# Altium PCB ffultra_pcb.PcbDoc (part 2 of 3)
Units mm, origin at the board's own origin, x right, y up, seen from the top; angles counter-clockwise.
Board outline 28 x 55 mm, 6 copper layers (Top, GND-T, Inner, Power, GND-B, Bottom), stack 1.538 mm thick; 121 components, 88 nets, 471 pads, 349 vias.
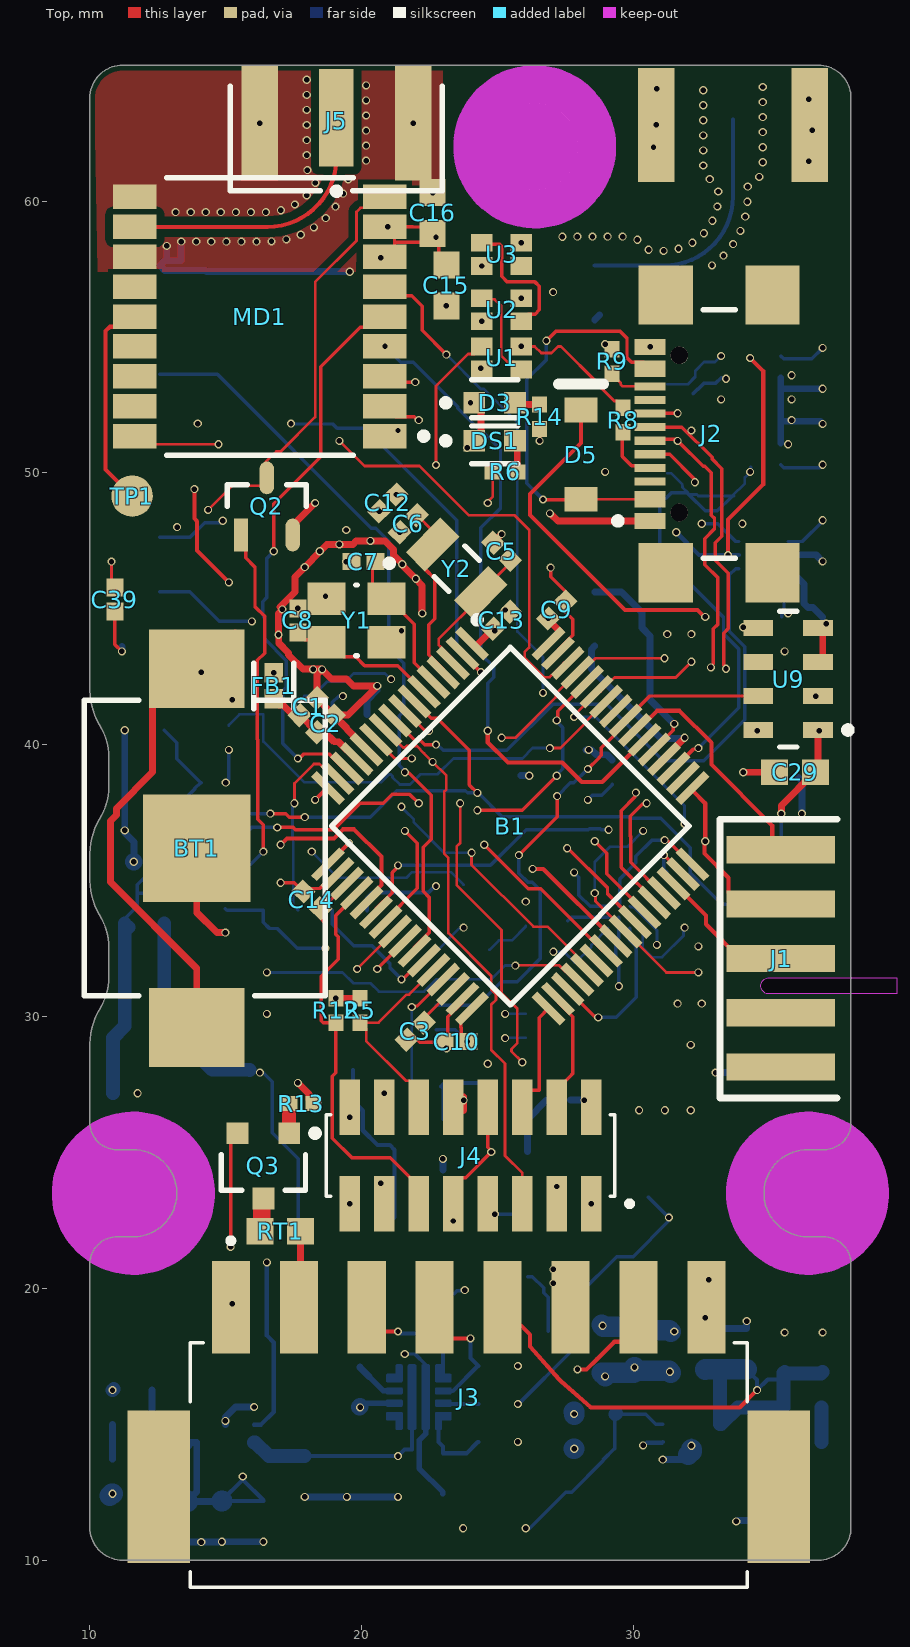
[diagram p0: Top view]

## Part data (continued)
U1 U2 U3: library part CMP-007-00038-2, "1615 RGB LEDs(Built-in IC) ROHS", JLCPCB Part Number=C5349954
U4: library part CMP-00025-00003-3, "LoRa-CC68 targeting 868MHz and with a TXCO"
U5: library part CMP-040-000000-2, "FLASH - NOR Memory IC 128Mb (16M x 8) SPI - Quad I/O, QPI, DTR 133 MHz 8-SOIC", Capacity=128Mb, JLCPCB Part Number=C97521, Package="SOIC-8 Winbond", Design Item ID=W25Q128JVSIQ, LCSC Part #=C97521, MF="Winbond Electronics", MP=W25Q128JVSIQ, Pin Count=8, Price=None
U6: library part CMP-157-000000-2, "No Description Available", JLCPCB Part Number=C5368700, Mfr_Name="Bosch Sensortec", Design Item ID=BMI323, RefDes=RefDes, Source=BMI323.SchLib, Type=Type
U7: library part CMP-010-00036-2, "X,Y,Z LGA-14(3x5) Accelerometer ROHS", Case/Package=VFLGA, JLCPCB Part Number=C481898, Max Operating Temperature=85°C, Max Supply Voltage=3.6V, Min Operating Temperature=-40°C, Min Supply Voltage=2V, Nominal Supply Voltage=2.5V, Pins=14, RoHS Compliant=Yes
U8: library part CMP-010-00035-2, "BMM350 Series 1.98 V I2C/I3C Interface 16 Bit 3 Axis Magnetometer - WLCSP-9", JLCPCB Part Number=C7496950
U9: library part CMP-010-00034-2, "Absolute, 4.35Psi Min, 15.95Psi Max, 0-3V, Rectangular, Surface Mount", JLCPCB Part Number=C97627, Max Operating Temperature=85°C, Max Supply Voltage=3.6V, Min Operating Temperature=-40°C, Min Supply Voltage=1.8V, Mounting Technology="Surface Mount", RoHS Compliant=Yes, Sensor Type="PRESSURE SENSOR,PEIZORESISTIVE"
U10: library part CMP-019-00060-6, "2.7-V to 16-V, 10-A, 6-mΩ load switch with fast overvoltage protection and current monitoring 10-VQFN-HR -40 to 125", JLCPCB Part Number=C17294173
U11_CH1 U11_CH2: library part CMP-019-00059-2, "Buffer/Inverter Based Peripheral Driver, 1 Driver, PDSO6", Case/Package=VSON, JLCPCB Part Number=C527679, Max Operating Temperature=105°C, Max Supply Voltage=18V, Min Operating Temperature=-40°C, Min Supply Voltage=2.7V, Height - Seated (Max)=0.8mm, JESD-30 Code=S-PDSO-N6, Pins=6, RoHS Compliant=Yes
U12: library part CMP-019-00064-1, "Fixed Positive LDO Regulator, 1.8V, 0.3V Dropout, PMOS, PDSO5", Case/Package=LSSOP, Dropout Voltage1-Max=300mV, Input Voltage Absolute-Max=10V, JLCPCB Part #=C7099, Min Input Voltage=2.7V, Operating Temperature, TJ-Max=125°C, Operating Temperature, TJ-Min=-40°C, Output Current1-Max=150mA, Output Voltage1-Max=1.867V, Output Voltage1-Min=1.733V, Output Voltage1-Nom=1.8V, Package Body Material=Plastic, Package Equivalence Code=TSOP5/6,.11,37, Package Shape=Rectangular, Package Style="SMALL OUTLINE, LOW PROFILE, SHRINK PITCHMeter", Peak Reflow Temperature (Cel)=260°C, Voltage Tolerance-Max=3.7%, Adjustability=FIXED, Channels=1, Height - Seated (Max)=1.45mm, JESD-30 Code=R-PDSO-G5, JESD-609 Code=e4, Length=2.9mm, Line Regulation-Max=0.013%, Max Supply Voltage=10V, Moisture Sensitivity Level=1, Number of Outputs=1, Packaging="Tape and Reel", Pins=5, Qualification Status="Not Qualified", Reach SVHC Compliant=Yes, Regulator Type="FIXED POSITIVE SINGLE OUTPUT LDO REGULATOR", RoHS Compliant=Yes, Surface Mount=Yes, Technology=PMOS, Terminal Finish=Nickel, Terminal Form="Gull Wing", Terminal Pitch=0.95mm, Terminal Position=DUAL, Width=1.6mm
Y1: library part CMP-003-00030-1, "Crystal 16MHz ±20ppm (Tol) ±30ppm (Stability) 8pF FUND 80Ohm Automotive 4-Pin SMD", JLCPCB Part Number=C156247
Y2: library part CMP-003-00031-1, "Crystal 32.7680KHZ 7PF SMD", JLCPCB Part Number=C5136773

## Free pads (board coordinates)
  round 3.2 hole 3.2 unplated: 4(26.364,62)

## Via types
v1: diameter 0.3, hole 0.2, Top to Bottom, tented both sides, 349 vias

## Nets (pads, with @x,y where several pads share a name; then routed paths per layer and width w, separated by ;. In a path a pad name is that pad's centre, name@x,y a point inside that pad or via, vN(x,y) a via of type N, cw(c..) or ccw(c..) an arc to the next point about the centre after c; other vN are vias at no path point)
1V8: C24.2 U8.C1 U12.5 | length 9.2
  Inner w0.1: v1(27.051,32.385) 28.902,30.534 30.528,30.534 v1(32.106,28.956)
  Bottom w0.1: v1(27.051,32.385) 27.444,32.385 C24.2@27.844,31.985 27.869,31.985 28.448,32.564 28.448,32.639 U8.C1@29.064,33.255